# Altium PCB PHASE_SHIFTER.PcbDoc (part 2 of 2)
Units mm, origin at the board's own origin, x right, y up, seen from the top; angles counter-clockwise.
Board outline 49.45 x 41.36 mm, 4 copper layers (Top Layer, GND, signal, Bottom Layer), stack 0.619 mm thick; 108 components, 104 nets, 427 pads, 760 vias.
Unrouted connection lines stored in the file: 109.
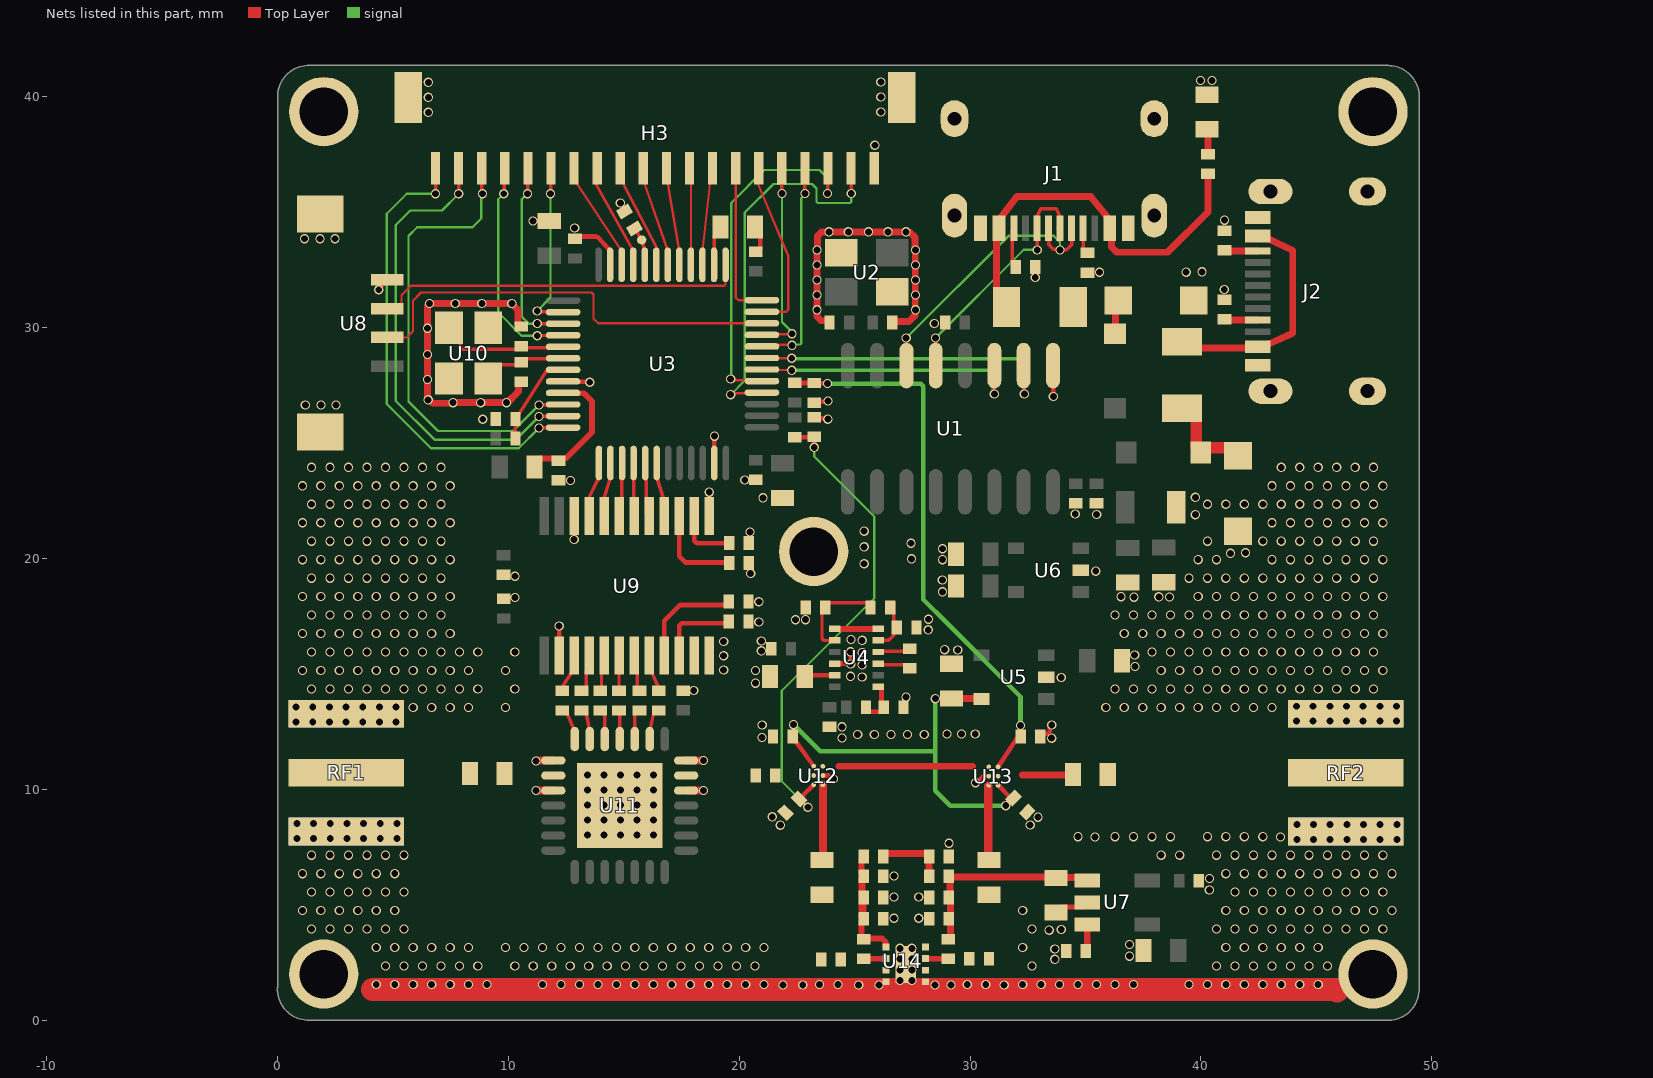
[diagram p4: the nets of this part, all layers, seen from the top]

## Via types
v1: diameter 0.4, hole 0.3, Top Layer to Bottom Layer, tented both sides, 760 vias

## Nets (pads, with @x,y where several pads share a name; then routed paths per layer and width w, separated by ;. In a path a pad name is that pad's centre, name@x,y a point inside that pad or via, vN(x,y) a via of type N, cw(c..) or ccw(c..) an arc to the next point about the centre after c; other vN are vias at no path point) (continued)
GND: C1.1 C2.1 C3.1 C4.1 C5.1 C6.2 C7.2 C8.2 C9.2 C10.2 C11.2 C12.2 C13.2 C15.1 C16.1 C17.1 C18.2 C19.2 C20.2 C21.1 C22.1 C23.1 C24.1 C25.1 C26.2 C27.2 C28.2 C29.1 C30.2 C31.2 C32.1 C33.2 C34.1 C35.1 C36.1 C37.1 C38.1 C39.1 C43.1 C46.1 D2.2 D4.2 D5.2 H3.20 H3.21 H3.22 J1.13 J1.14 J1.A1B12 J1.B1A12 J2.13 J2.14 J2.A1B12 J2.B1A12 pad. R2.2 R3.2 R4.2 R5.2 R7.2 R10.2 R11.1 R12.1 R14.2 R15.2 R16.1 R17.1 R26.2 R27.2 RF1.2 RF1.3 RF1.4 RF2.2 RF2.3 RF2.4 U1.1 U2.2 U2.4 U3.8 U3.23 U3.47 U4.1 U4.4 U4.12 U4.13 U5.2 U6.2 U7.2 U8.1 U8.5 U8.6 U9.2 U9.11 U9.12 U9.13 U9.22 U10.2 U10.4 U11.1 U11.3 U11.19 U11.21 U11.29 U12.2 U13.2 U14.0 U14.3 U14.4 U14.5 U14.6 U14.8 | length 90.2
  Top Layer w0.2: U9.2@12.2,15.802 v1(12.2,17.075) ; U3.8@12.373,27.672 12.388,27.656 13.504,27.656 v1(13.525,27.636) ; v1@12.85,20.825 U9.22@12.85,21.848 ; C22.1@12.9,33.95 13.759,33.95 ; 13.76,33.95 cw(c13.758,33.75) 13.906,33.884 14.044,33.733 14.408,33.331 U3.47@14.408,32.721 ; v1(14.85,35.4) 14.995,35.148 R11.1@15.038,35.029 ; U9.13@18.7,21.848 v1(18.7,22.875) ; U3.23@18.924,24.136 18.924,25.299 v1(18.925,25.3) ; R27.2@23.25,26.75 23.289,26.789 23.81,26.789 v1(23.848,26.827) ; R26.2@23.251,26.116 23.292,26.075 23.8,26.075 v1(23.839,26.036) ; U12.2@23.625,10.6 23.871,10.599 24.021,10.45 v1(24.075,10.45) ; U4.4@24.135,15.45 v1@24.825,15.45 ; v1@24.825,15.95 24.829,15.946 24.827,15.944 24.827,15.441 v1@24.829,15.439 ; v1(30.238,10.288) 30.292,10.288 30.576,10.572 U13.2@30.811,10.573 ; R4.2@32.822,32.627 32.859,32.59 R4.2@32.859,32.346 ; R4.2@32.824,32.627 32.826,32.63 R4.2@32.826,32.812 ; C43.1@33.05,12.25 33.05,12.294 33.162,12.406 33.342,12.406 33.442,12.506 33.442,12.69 v1(33.538,12.786) ; U1.1@33.591,28.356 33.599,28.348 33.599,27.022 v1(33.607,27.014) ; C23.1@33.713,4.665 33.954,4.906 34.881,4.906 U7.2@35.075,5.1 ; U7.2@35.088,4.911 U7.2@35.113,4.936
  Top Layer w0.25: v1(4.386,31.642) 4.386,31.712 U8.1@4.75,32.075 ; U4.1@24.135,16.95 U4.12@26.015,16.95 ; U5.2@33.298,14.864 U5.2@33.328,14.835 ; R12.1@34.166,3.006 R12.1@34.198,2.973
  Top Layer w0.3: v1(6.5,28.838) v1(6.5,29.975) 6.5,30.962 v1(6.588,31.05) v1(7.7,31.05) v1(8.85,31.05) 10.104,31.05 v1@10.117,31.036 ; v1@6.55,28.838 6.55,28.783 6.5,28.733 v1(6.5,27.75) 6.5,26.9 v1(6.525,26.875) 6.579,26.875 6.729,26.725 7.575,26.725 v1(7.6,26.75) v1(8.8,26.75) v1(9.925,26.75) 9.944,26.769 9.974,26.769 10.442,27.237 10.442,27.609 10.519,27.686 C30.2@10.561,27.686 ; v1(10.15,31.05) 10.15,31.023 10.417,30.755 10.417,30.161 10.492,30.086 C28.2@10.557,30.086 ; v1(23.372,33.368) 23.391,33.387 23.391,33.974 23.567,34.15 v1(23.887,34.15) v1(24.725,34.15) v1(25.601,34.15) v1@26.412,34.15 ; v1@23.375,33.368 23.375,32.719 23.375,32.069 23.375,31.42 23.375,30.77 23.375,30.476 23.551,30.3 23.841,30.3 C7.2@23.912,30.229 ; v1(26.44,34.15) v1(27.225,34.15) ; C6.2@26.627,30.228 26.674,30.275 27.35,30.275 27.625,30.55 27.625,30.77 27.625,31.42 27.625,32.069 27.625,32.719 27.625,33.368 27.613,33.38 27.613,33.916 27.398,34.131 27.271,34.131 v1@27.245,34.105
  Top Layer w0.35: v1(11.2,11.225) 11.214,11.225 11.236,11.247 11.945,11.247 U11.1@11.947,11.25 ; v1@11.3,9.95 U11.3@11.974,9.95 ; U11.21@17.703,11.25 v1(18.45,11.25) ; U11.19@17.81,9.948 v1(18.45,9.948)
  Top Layer w1: 4.125,1.327 45.848,1.327 45.9,1.275
  other v1: 21.9,1.525 22.75,1.525 25.175,1.525 26.05,1.525 28.475,1.525 29.175,1.525 31.475,1.525 4.278,1.549 5.078,1.549 5.878,1.549 6.678,1.549 7.478,1.549 8.278,1.549 9.078,1.549 11.478,1.549 12.278,1.549 13.078,1.549 13.878,1.549 14.678,1.549 15.478,1.549 16.278,1.549 17.078,1.549 17.878,1.549 18.678,1.549 19.478,1.549 20.278,1.549 21.078,1.549 23.478,1.549 24.278,1.549 29.878,1.549 30.678,1.549 32.279,1.549 33.079,1.549 33.879,1.549 34.679,1.549 35.479,1.549 36.279,1.549 37.079,1.549 39.479,1.549 40.279,1.549 41.079,1.549 41.879,1.549 42.679,1.549 43.479,1.549 44.279,1.549 45.079,1.549 26.959,1.718 27.475,1.718 26.959,2.184 27.475,2.184 4.678,2.349 5.478,2.349 6.278,2.349 7.078,2.349 7.878,2.349 8.678,2.349 10.278,2.349 11.078,2.349 11.878,2.349 12.678,2.349 13.478,2.349 14.278,2.349 15.078,2.349 15.878,2.349 16.678,2.349 17.478,2.349 18.278,2.349 19.078,2.349 19.878,2.349 20.678,2.349 32.678,2.349 40.679,2.349 41.479,2.349 42.279,2.349 43.079,2.349 43.879,2.349 44.679,2.349 45.479,2.349 26.959,2.65 27.475,2.65 33.67,2.637 36.9,2.775 33.671,3.083 26.959,3.116 27.475,3.116 4.278,3.149 5.078,3.149 5.878,3.149 6.678,3.149 7.478,3.149 8.278,3.149 9.878,3.149 10.678,3.149 11.478,3.149 12.278,3.149 13.078,3.149 13.878,3.149 14.678,3.149 15.478,3.149 16.278,3.149 17.078,3.149 17.878,3.149 18.678,3.149 19.478,3.149 20.278,3.149 21.078,3.149 32.279,3.149 41.079,3.149 41.879,3.149 42.679,3.149 43.479,3.149 44.279,3.149 45.079,3.149 36.9,3.275 33.425,3.9 33.95,3.925 1.478,3.949 2.278,3.949 3.078,3.949 3.878,3.949 4.678,3.949 5.478,3.949 32.678,3.949 40.679,3.949 41.479,3.949 42.279,3.949 43.079,3.949 43.879,3.949 44.679,3.949 45.479,3.949 46.279,3.949 47.079,3.949 47.879,3.949 26.7,4.418 27.775,4.418 1.078,4.749 1.878,4.749 2.678,4.749 3.478,4.749 4.278,4.749 5.078,4.749 32.279,4.749 41.079,4.749 41.879,4.749 42.679,4.749 43.479,4.749 44.279,4.749 45.079,4.749 45.879,4.749 46.679,4.749 47.479,4.749 48.279,4.749 26.7,5.343 27.775,5.343 1.478,5.549 2.278,5.549 3.078,5.549 3.878,5.549 4.678,5.549 5.478,5.549 41.479,5.549 42.279,5.549 43.079,5.549 43.879,5.549 44.679,5.549 45.479,5.549 46.279,5.549 47.079,5.549 47.879,5.549 40.364,5.645 40.369,6.135 26.7,6.243 1.078,6.349 1.878,6.349 2.678,6.349 3.478,6.349 4.278,6.349 5.078,6.349 41.079,6.349 41.879,6.349 42.679,6.349 43.479,6.349 44.279,6.349 45.079,6.349 45.879,6.349 46.679,6.349 47.479,6.349 48.279,6.349 1.478,7.149 2.278,7.149 3.078,7.149 3.878,7.149 4.678,7.149 5.478,7.149 38.279,7.149 39.079,7.149 40.679,7.149 41.479,7.149 42.279,7.149 43.079,7.149 43.879,7.149 44.679,7.149 45.479,7.149 46.279,7.149 47.079,7.149 47.879,7.149 29.084,7.665 44.153,7.83 44.875,7.83 45.597,7.83 46.318,7.83 47.04,7.83 47.762,7.83 48.484,7.83 0.84,7.869 1.562,7.869 2.284,7.869 3.006,7.869 3.728,7.869 4.449,7.869 5.171,7.869 35.415,7.936 34.679,7.949 36.279,7.949 37.079,7.949 37.879,7.949 38.679,7.949 40.279,7.949 41.079,7.949 41.879,7.949 42.679,7.949 43.444,7.942 13.419,8.027 14.138,8.027 14.856,8.027 15.575,8.027 16.294,8.027 21.779,8.45 32.603,8.454 44.153,8.478 44.875,8.478 45.597,8.478 46.318,8.478 47.04,8.478 47.762,8.478 48.484,8.478 0.84,8.516 1.562,8.516 2.284,8.516 3.006,8.516 3.728,8.516 4.449,8.516 5.171,8.516 13.419,8.676 14.138,8.676 14.856,8.676 15.575,8.676 16.294,8.676 32.937,8.797 21.432,8.81 13.419,9.325 14.138,9.325 14.856,9.325 15.575,9.325 16.294,9.325 11.2,9.95 13.419,9.974 14.138,9.974 14.856,9.974 15.575,9.974 16.294,9.974 13.419,10.623 14.138,10.623 14.856,10.623 15.575,10.623 16.294,10.623 24.448,12.223 33.532,12.219 20.984,12.242 25.13,12.381 25.851,12.381 26.572,12.381 27.292,12.381 28.013,12.381 29,12.4 29.625,12.4 30.225,12.4 24.448,12.709 20.994,12.784 0.805,12.924 1.527,12.924 2.248,12.924 2.97,12.924 3.692,12.924 4.414,12.924 5.136,12.924 44.138,12.953 44.859,12.953 45.581,12.953 46.303,12.953 47.025,12.953 47.746,12.953 48.468,12.953 5.878,13.549 6.678,13.549 7.478,13.549 8.278,13.549 9.878,13.549 35.879,13.549 36.679,13.549 37.479,13.549 38.279,13.549 39.079,13.549 39.879,13.549 40.679,13.549 41.479,13.549 42.279,13.549 43.079,13.549 0.805,13.571 1.527,13.571 2.248,13.571 2.97,13.571 3.692,13.571 4.414,13.571 5.136,13.571 44.138,13.6 44.859,13.6 45.581,13.6 46.303,13.6 47.025,13.6 47.746,13.6 48.468,13.6 27.221,13.995 18.031,14.284 1.478,14.349 2.278,14.349 3.078,14.349 3.878,14.349 4.678,14.349 5.478,14.349 6.278,14.349 7.078,14.349 7.878,14.349 8.678,14.349 10.278,14.349 36.279,14.349 37.079,14.349 37.879,14.349 38.679,14.349 39.479,14.349 40.279,14.349 41.079,14.349 41.879,14.349 42.679,14.349 43.479,14.349 44.279,14.349 45.079,14.349 45.879,14.349 46.679,14.349 47.479,14.349 20.7,14.6 33.95,14.846 25.326,14.865 24.821,14.898 1.078,15.149 1.878,15.149 2.678,15.149 3.478,15.149 4.278,15.149 5.078,15.149 5.878,15.149 6.678,15.149 7.478,15.149 8.278,15.149 9.878,15.149 20.7,15.15 38.279,15.149 39.079,15.149 39.879,15.149 40.679,15.149 41.479,15.149 42.279,15.149 43.079,15.149 43.879,15.149 44.679,15.149 45.479,15.149 46.279,15.149 47.079,15.149 47.879,15.149 19.325,15.175 37.139,15.32 25.326,15.396 24.829,15.428 19.325,15.787 37.128,15.815 25.326,15.925 1.478,15.949 2.278,15.949 3.078,15.949 3.878,15.949 4.678,15.949 5.478,15.949 6.278,15.949 7.078,15.949 7.878,15.949 8.678,15.949 10.278,15.949 24.825,15.958 37.879,15.949 38.679,15.949 39.479,15.949 40.279,15.949 41.079,15.949 41.879,15.949 42.679,15.949 43.479,15.949 44.279,15.949 45.079,15.949 45.879,15.949 46.679,15.949 47.479,15.949 20.956,16 29.467,16.035 28.9,16.05 19.325,16.4 20.956,16.423 25.326,16.456 24.841,16.489 1.078,16.749 1.878,16.749 2.678,16.749 3.478,16.749 4.278,16.749 5.078,16.749 5.878,16.749 6.678,16.749 7.478,16.749 36.679,16.749 37.479,16.749 38.279,16.749 39.079,16.749 39.879,16.749 40.679,16.749 41.479,16.749 42.279,16.749 43.079,16.749 43.879,16.749 44.679,16.749 45.479,16.749 46.279,16.749 47.079,16.749 47.879,16.749 28.187,16.912 20.85,17.252 22.436,17.347 22.875,17.35 28.195,17.368 1.478,17.549 2.278,17.549 3.078,17.549 3.878,17.549 4.678,17.549 5.478,17.549 6.278,17.549 7.078,17.549 36.279,17.549 37.079,17.549 37.879,17.549 38.679,17.549 39.479,17.549 40.279,17.549 41.079,17.549 41.879,17.549 42.679,17.549 43.479,17.549 44.279,17.549 45.079,17.549 45.879,17.549 46.679,17.549 47.479,17.549 20.85,18.127 10.292,18.311 37.105,18.325 1.078,18.349 1.878,18.349 2.678,18.349 3.478,18.349 4.278,18.349 5.078,18.349 5.878,18.349 6.678,18.349 7.478,18.349 36.536,18.348 38.175,18.338 38.639,18.334 39.879,18.349 40.679,18.349 41.479,18.349 42.279,18.349 43.079,18.349 43.879,18.349 44.679,18.349 45.479,18.349 46.279,18.349 47.079,18.349 47.879,18.349 28.803,18.556 28.797,19.066 1.478,19.149 2.278,19.149 3.078,19.149 3.878,19.149 4.678,19.149 5.478,19.149 6.278,19.149 7.078,19.149 39.479,19.149 40.279,19.149 41.079,19.149 41.879,19.149 42.679,19.149 43.479,19.149 44.279,19.149 45.079,19.149 45.879,19.149 46.679,19.149 47.479,19.149 10.289,19.231 20.497,19.346 35.444,19.452 25.413,19.773 1.078,19.949 1.878,19.949 2.678,19.949 3.478,19.949 4.278,19.949 5.078,19.949 5.878,19.949 6.678,19.949 7.478,19.949 28.8,19.95 39.879,19.949 40.679,19.949 43.079,19.949 43.879,19.949 44.679,19.949 45.479,19.949 46.279,19.949 47.079,19.949 47.879,19.949 27.463,19.986 41.275,20.225 41.925,20.25 28.801,20.422 25.413,20.507 27.443,20.661 1.478,20.749 2.278,20.749 3.078,20.749 3.878,20.749 4.678,20.749 5.478,20.749 6.278,20.749 7.078,20.749 40.279,20.749 42.679,20.749 43.479,20.749 44.279,20.749 45.079,20.749 45.879,20.749 46.679,20.749 47.479,20.749 12.85,20.825 20.472,21.152 25.413,21.186 1.078,21.549 1.878,21.549 2.678,21.549 3.478,21.549 4.278,21.549 5.078,21.549 5.878,21.549 6.678,21.549 7.478,21.549 43.079,21.549 43.879,21.549 44.679,21.549 45.479,21.549 46.279,21.549 47.079,21.549 47.879,21.549 39.755,21.9 34.556,21.928 35.482,21.911 1.478,22.349 2.278,22.349 3.078,22.349 3.878,22.349 4.678,22.349 5.478,22.349 6.278,22.349 7.078,22.349 40.279,22.349 41.079,22.349 41.879,22.349 42.679,22.349 43.479,22.349 44.279,22.349 45.079,22.349 45.879,22.349 46.679,22.349 47.479,22.349 21.031,22.627 39.755,22.65 1.078,23.149 1.878,23.149 2.678,23.149 3.478,23.149 4.278,23.149 5.078,23.149 5.878,23.149 6.678,23.149 7.478,23.149 43.079,23.149 43.879,23.149 44.679,23.149 45.479,23.149 46.279,23.149 47.079,23.149 47.879,23.149 12.694,23.377 20.24,23.403 1.478,23.949 2.278,23.949 3.078,23.949 3.878,23.949 4.678,23.949 5.478,23.949 6.278,23.949 7.078,23.949 43.479,23.949 44.279,23.949 45.079,23.949 45.879,23.949 46.679,23.949 47.479,23.949 8.891,26.031 1.205,26.644 1.88,26.644 2.53,26.644 28.45,30.175 23.372,30.77 27.632,30.77 23.372,31.42 27.632,31.42 41.01,31.658 23.372,32.069 27.632,32.069 32.824,32.169 35.602,32.398 39.361,32.404 40.043,32.416 23.372,32.719 27.632,32.719 27.632,33.368 1.169,33.849 1.844,33.849 2.494,33.849 12.873,34.316 11.071,34.618 41.02,34.656 25.875,37.9 6.533,39.327 26.134,39.339 6.533,39.977 26.134,39.989 6.533,40.627 26.134,40.639 39.975,40.7 40.475,40.7
HXT_IN: C28.1 U3.5 U10.1 | length 5.7
  Top Layer w0.15: U10.1@7.425,30 7.915,29.51 7.915,29.144 8.003,29.056 10.472,29.056 C28.1@10.611,29.195 ; C28.1@10.557,29.236 10.667,29.126 11.684,29.126 11.728,29.17 U3.5@12.373,29.17
HXT_OUT: C30.1 U3.6 U10.3 | length 3.6
  Top Layer w0.15: U10.3@9.125,27.8 9.125,27.9 9.622,28.397 10.343,28.397 10.506,28.559 C30.1@10.631,28.559 ; C30.1@10.651,28.654 12.358,28.654 U3.6@12.373,28.67
LED: D6.2 U3.38 | length 1.4
  Top Layer w0.15: U3.38@18.913,32.726 18.913,33.944 D6.2@19.035,34.065
LNA_5V: C23.2 C34.2 C38.2 L3.2 R24.2 U7.1 | length 9
  Top Layer w0.3: L3.2@29.055,3.507 29.073,3.507 29.148,3.582 29.148,4.326 C38.2@29.077,4.397 29.143,4.464 29.143,5.256 C34.2@29.077,5.322 29.139,5.384 29.139,6.173 R24.2@29.077,6.235 ; R24.2@29.077,6.2 33.678,6.2 C23.2@33.713,6.165 ; C23.2@33.732,6.184 34.941,6.184 U7.1@35.075,6.05 U7.1@35.106,6.081
LNA_IN: C44.2 C47.2
LNA_OUT: C45.1 C48.2
NetA4B9: J2.A4B9 J2.B4A9 X2.2 | length 9.4
  Top Layer w0.3: X2.2@39.125,29.42 39.436,29.109 42.397,29.109 J2.A4B9@42.461,29.173 ; J2.B4A9@42.92,33.849 43.975,33.341 43.975,29.763 J2.A4B9@42.938,29.289
NetC8_1: C8.1 R8.1 U4.11 | length 2.2
  Top Layer w0.15: U4.11@26.015,16.45 26.462,16.45 26.691,16.679 26.691,16.856 C8.1@26.841,17.006 ; C8.1@26.685,17 R8.1@26.685,18.064
NetC14_1: C14.1 U4.9 | length 1.5
  Top Layer w0.15: U4.9@26.015,15.45 26.073,15.392 27.159,15.392 27.309,15.241 C14.1@27.384,15.241
NetC14_2: C14.2 U4.10 | length 1.5
  Top Layer w0.15: U4.10@26.015,15.95 26.052,15.987 27.28,15.987 C14.2@27.409,16.116
NetC16_2: C16.2 U4.5 | length 1.1
  Top Layer w0.2: C16.2@22.997,14.95 U4.5@24.135,14.95
NetC31_1: C31.1 R24.1 R25.1 | length 3
  Top Layer w0.3: R25.1@26.245,7.086 26.245,7.15 26.32,7.225 28.152,7.225 28.227,7.15 R24.1@28.227,6.235
NetC32_2: C32.2 C36.2 C39.2 L2.2 R25.2 U14.1 | length 6
  Top Layer w0.25: C36.2@25.395,5.252 C39.2@25.395,4.398 25.3,4.304 25.3,3.61 L2.2@25.394,3.516 25.422,3.543 26.189,3.543 26.336,3.397 26.336,3.191 U14.1@26.361,3.167 ; C32.2@25.395,6.236 25.295,6.336 25.295,6.986 R25.2@25.395,7.086
  Top Layer w0.3: C39.2@25.395,4.398 25.324,4.469 25.324,5.252 C36.2@25.395,5.323 25.327,5.391 25.327,6.168 C32.2@25.395,6.236
NetC40_1: C40.1 U11.2
NetC40_2: C40.2 RF1.1
NetC41_1: C41.1 U12.5
NetC41_2: C41.2 U11.20
NetC42_1: C42.1 RF2.1
NetC42_2: C42.2 U13.5 | length 2.2
  Top Layer w0.292: 32.262,10.619 C42.2@34.46,10.619
NetC43_2: 
NetC44_1: C44.1 L2.1 U14.2 | length 1
  Top Layer w0.25: L2.1@25.396,2.666 U14.2@26.361,2.666
NetC45_2: C45.2 L3.1 U14.7 | length 1
  Top Layer w0.25: U14.7@28.065,2.662 L3.1@29.051,2.662
NetC47_1: C47.1 U12.1 | length 3.3
  Top Layer w0.358: C47.1@23.625,6.91 U12.1@23.625,10.2
NetC48_1: C48.1 U13.3 | length 3.3
  Top Layer w0.358: C48.1@30.792,6.885 U13.3@30.792,10.154
NetD1_2: D1.2 D2.1 X2.1 | length 4.2
  Top Layer w0.5: X2.1@39.394,26.53 39.577,26.53 39.795,26.312 39.795,24.818 39.904,24.71 D1.2@40.055,24.71 ; D1.2@39.988,24.586 40.197,24.795 41.251,24.795 41.6,24.446 D2.1@41.6,24.385
NetD3_2: D3.2 D4.1 X1.1 | length 1.8
  Top Layer w0.3: D4.1@36.215,31.35 36.29,31.425 36.29,29.75 D3.2@36.275,29.735
NetD5_1: D5.1 R1.1 | length 1.1
  Top Layer w0.3: D5.1@40.263,38.59 40.306,38.547 R1.1@40.306,37.509
NetD6_1: D6.1 R6.1 | length 1.4
  Top Layer w0.2: D6.1@20.585,34.313 20.91,33.987 20.91,33.414 20.767,33.271 R6.1@20.623,33.271
NetJ1_A4B9: J1.A4B9 J1.B4A9 R1.2 X1.2 | length 16.8
  Top Layer w0.3: X1.2@31.146,31.475 J1.B4A9@31.146,34.3 ; J1.B4A9@31.25,34.3 31.209,34.605 32.026,35.675 35.229,35.675 36.084,34.609 J1.A4B9@36.05,34.3 36.125,34.225 36.125,33.501 36.359,33.266 38.557,33.266 40.306,35.015 R1.2@40.306,36.659
NetJ1_A5: J1.A5 R2.1 | length 0.9
  Top Layer w0.15: R2.1@34.9,33.375 J1.A5@34.9,34.3
NetJ1_A7: J1.A7 J1.B7 U1.6 | length 13.1
  Top Layer w0.15: v1(27.232,29.547) 27.236,29.542 27.236,28.094 U1.6@27.27,28.061 ; J1.A7@33.4,34.3 33.4,33.6 33.607,33.394 33.865,33.394 v1(33.899,33.359) 33.92,33.38 34.18,33.38 34.4,33.6 J1.B7@34.4,34.3
  signal w0.1: v1(27.232,29.547) 31.66,33.975 33.625,33.975 33.891,33.709 33.891,33.368 v1(33.899,33.359)
NetJ1_B5: J1.B5 R4.1 | length 1.6
  Top Layer w0.15: R4.1@31.829,32.764 31.829,34.229 J1.B5@31.9,34.3 ; R4.1@31.831,32.764 R4.1@31.84,32.773
NetJ2_A5: J2.A5 R3.1 | length 1.5
  Top Layer w0.3: R3.1@40.982,30.366 41.025,30.323 J2.A5@42.461,30.323
NetJ2_B5: J2.B5 R5.1 | length 1.5
  Top Layer w0.3: R5.1@40.995,33.323 J2.B5@42.461,33.323 ; R5.1@40.999,33.315 R5.1@41.013,33.329
NetL5_1: 
NetL5_2: 
NetR7_1: R7.1 R8.2 U4.2 | length 4.2
  Top Layer w0.15: R7.1@23.734,17.919 23.734,17.991 23.832,18.089 25.564,18.089 R8.2@25.709,17.944 ; R7.1@23.784,17.969 23.586,17.771 23.586,16.537 23.674,16.449 U4.2@24.135,16.45
NetR9_2: R9.2 R10.1 U4.7 | length 2.1
  Top Layer w0.2: R9.2@25.491,13.556 25.491,13.493 25.616,13.368 26.141,13.368 26.266,13.493 R10.1@26.266,13.556 26.163,13.556 26.163,14.41 26.123,14.45 U4.7@26.015,14.45
NetR11_2: R11.2 TP1.1 U3.44 | length 1.7
  Top Layer w0.15: R11.2@15.463,34.293 15.571,34.153 TP1.1@15.775,33.8 15.909,33.331 U3.44@15.909,32.721
NetR12_2: R12.2 U7.3 | length 1.1
  Top Layer w0.3: R12.2@35,2.887 R12.2@35.067,2.954 ; R12.2@35.075,3.163 U7.3@35.075,4.15
NetR14_1: R14.1 U9.9 | length 4.7
  Top Layer w0.2: U9.9@16.75,15.802 16.75,17.3 17.438,17.988 19.425,17.988 19.55,18.113 R14.1@19.55,18.134
NetR15_1: R15.1 U9.10 | length 3.5
  Top Layer w0.2: U9.10@17.4,15.802 17.4,17.084 17.517,17.201 19.482,17.201 R15.1@19.55,17.269
NetR16_2: R16.2 U9.15 | length 4
  Top Layer w0.2: U9.15@17.4,21.848 17.4,20.1 17.675,19.825 R16.2@19.568,19.825
NetR17_2: R17.2 U9.14 | length 2.7
  Top Layer w0.2: U9.14@18.05,21.848 18.05,20.77 18.167,20.653 R17.2@19.543,20.653 ; R17.2@19.496,20.606 R17.2@19.543,20.653 ; R17.2@19.568,20.653 R17.2@19.543,20.653 ; R17.2@19.568,20.678 R17.2@19.543,20.653
NetR32_1: 
NetU12_3: U12.3 U13.1 | length 5.8
  Top Layer w0.292: 24.325,11.004 30.106,11.004
NRST: C29.2 R13.1 U3.7 | length 3.4
  Top Layer w0.15: R13.1@10.307,25.2 C29.2@10.307,26.036 10.457,26.261 U3.7@11.667,28.162
P1: R18.2 U11.28 | length 1.4
  Top Layer w0.15: R18.2@12.336,13.418 12.536,13.293 12.875,12.523 U11.28@12.875,12.178
P1_CTL: R18.1 U9.3 | length 1.7
  Top Layer w0.15: R18.1@12.336,14.268 12.309,14.385 12.725,15.051 U9.3@12.85,15.802
P1_IN: U3.13 U9.21 | length 1.6
  Top Layer w0.15: U9.21@13.492,22.633 13.923,23.526 U3.13@13.923,24.136
P2: R19.2 U11.27 | length 1.4
  Top Layer w0.15: R19.2@13.371,13.293 U11.27@13.525,12.523
  Top Layer w0.2: R19.2@13.171,13.418 R19.2@13.371,13.293 ; U11.27@13.525,12.178 U11.27@13.525,12.523
P2_CTL: R19.1 U9.4 | length 1.6
  Top Layer w0.15: R19.1@13.171,14.268 13.375,14.418 13.375,15.052 U9.4@13.5,15.802
P2_IN: U3.14 U9.20 | length 1.5
  Top Layer w0.15: U9.20@14.156,22.644 14.423,23.526 U3.14@14.423,24.136
P3: R20.2 U11.26 | length 1.3
  Top Layer w0.15: R20.2@13.981,13.418 14.175,13.268 U11.26@14.175,12.178
P3_CTL: R20.1 U9.5 | length 1.6
  Top Layer w0.15: R20.1@13.981,14.268 14.035,14.322 14.035,15.112 U9.5@14.15,15.802
P3_IN: U3.15 U9.19 | length 2.3
  Top Layer w0.15: U9.19@14.8,21.848 14.906,21.954 14.906,24.119 U3.15@14.923,24.136
P4: R21.2 U11.25 | length 1.2
  Top Layer w0.15: R21.2@14.791,13.418 14.825,13.268 U11.25@14.825,12.178
P4_CTL: R21.1 U9.6 | length 1.5
  Top Layer w0.15: R21.1@14.791,14.268 14.792,14.418 14.792,15.052 U9.6@14.8,15.802
P4_IN: U3.16 U9.18 | length 2.3
  Top Layer w0.15: U3.16@15.424,24.136 15.437,24.123 15.437,21.861 U9.18@15.45,21.848
P5: R22.2 U11.24 | length 1.3
  Top Layer w0.15: U11.24@15.475,12.178 15.475,13.268 R22.2@15.676,13.418
P5_CTL: R22.1 U9.7 | length 1.6
  Top Layer w0.15: U9.7@15.45,15.802 15.575,15.052 15.575,14.418 R22.1@15.676,14.268
P5_IN: U3.17 U9.17 | length 2.4
  Top Layer w0.15: U3.17@15.924,24.136 15.924,23.491 15.982,23.432 15.982,21.965 U9.17@16.1,21.848
P6: R23.2 U11.23 | length 1.4
  Top Layer w0.15: U11.23@16.125,12.178 16.125,12.523 16.286,13.268 R23.2@16.511,13.418
P6_CTL: R23.1 U9.8 | length 1.4
  Top Layer w0.15: U9.8@16.1,15.802 16.225,15.052 R23.1@16.488,14.432
P6_IN: U3.18 U9.16 | length 1.5
  Top Layer w0.15: U3.18@16.424,24.136 16.424,23.526 U9.16@16.704,22.629
PA0: H3.3 U3.10 | length 20.6
  Top Layer w0.15: H3.3@8.845,36.908 8.845,35.78 v1@8.875,35.75 ; v1(11.325,26.65) 11.335,26.66 12.363,26.66 U3.10@12.373,26.671
  signal w0.1: v1(8.875,35.8) 8.825,35.75 8.825,34.725 8.45,34.35 6.05,34.35 5.675,33.975 5.675,26.8 6.95,25.525 10.2,25.525 v1(11.325,26.65)
PA1: H3.2 U3.11 | length 20.4
  Top Layer w0.15: H3.2@7.845,36.908 7.845,35.755 v1@7.85,35.75 ; v1(11.325,26.15) 11.335,26.16 12.363,26.16 U3.11@12.373,26.17
  signal w0.1: v1(7.848,35.8) 7.123,35.075 5.75,35.075 5.125,34.45 5.125,26.825 6.8,25.15 10.325,25.15 v1(11.325,26.15)
PA2: H3.1 U3.12 | length 20.7
  Top Layer w0.15: v1@6.845,35.705 H3.1@6.845,36.908 ; v1(11.325,25.65) 11.335,25.66 12.363,25.66 U3.12@12.373,25.67
  signal w0.1: v1(6.845,35.8) 5.6,35.8 4.736,34.936 4.736,26.689 6.65,24.775 10.45,24.775 v1(11.325,25.65)
PA8: H3.18 U3.29 | length 15.6
  Top Layer w0.1: v1@19.605,27.779 19.662,27.721 19.749,27.721 19.754,27.717 20.954,27.717 U3.29@20.984,27.687
  Top Layer w0.15: H3.18@23.845,36.908 23.845,35.905 v1@23.85,35.9
  signal w0.1: v1(19.631,27.779) 19.653,27.801 19.653,35.403 21.075,36.825 23.475,36.825 23.826,36.474 v1(23.826,35.814)
PA11: H3.17 U3.32 | length 9.4
  Top Layer w0.1: U3.32@20.984,29.185 21.642,29.185 21.71,29.253 22.262,29.253 v1(22.28,29.235)
  Top Layer w0.15: H3.17@22.845,36.908 22.847,36.906 22.847,35.764 v1@22.849,35.762
  signal w0.1: v1(22.28,29.235) 22.312,29.267 22.628,29.267 22.686,29.326 22.686,35.6 v1@22.849,35.762
  other v1: 22.849,35.814
PA12: H3.16 U3.33 | length 8.7
  Top Layer w0.1: U3.33@20.984,29.686 21.642,29.686 21.667,29.71 22.256,29.71 v1(22.28,29.735)
  Top Layer w0.15: H3.16@21.845,36.908 21.848,36.905 21.848,35.817 v1(21.851,35.814)
  signal w0.1: v1(21.851,35.814) 21.851,30.239 22.28,29.81 v1(22.28,29.735)
PB3: H3.13 U3.39 | length 3.5
  Top Layer w0.1: U3.39@18.408,32.721 18.408,33.331 H3.13@18.73,36.251
PB4: H3.12 U3.40 | length 4.2
  Top Layer w0.1: H3.12@17.845,36.908 17.908,36.845 U3.40@17.908,32.721
PB5: H3.11 U3.41 | length 3.6
  Top Layer w0.1: H3.11@16.91,36.251 17.407,33.331 U3.41@17.407,32.721
PB6: H3.10 U3.42 | length 3.7
  Top Layer w0.1: H3.10@15.892,36.244 16.907,33.331 U3.42@16.907,32.721
PB7: H3.9 U3.43 | length 3.9
  Top Layer w0.1: H3.9@14.845,36.908 15.021,36.145 U3.43@16.45,33.424
PB8: H3.8 U3.45 | length 3.9
  Top Layer w0.1: H3.8@13.784,36.237 15.408,33.331 U3.45@15.408,32.721
PB9: H3.7 U3.46 | length 4.1
  Top Layer w0.1: H3.7@12.977,36.223 14.908,33.331 U3.46@14.908,32.721
PB15: H3.19 U3.28 | length 16.8
  Top Layer w0.1: v1(19.631,27.096) 19.687,27.152 20.95,27.152 U3.28@20.984,27.186
  Top Layer w0.15: H3.19@24.845,36.908 24.848,36.905 24.848,35.817 v1(24.851,35.814)
  signal w0.1: v1(19.631,27.096) 20.233,27.699 20.233,34.977 21.481,36.224 23.151,36.224 23.35,36.025 23.35,35.458 23.409,35.399 24.793,35.399 24.851,35.458 v1(24.851,35.814)
PC13: H3.6 U3.2 | length 7.6
  Top Layer w0.15: v1(11.25,30.726) 11.28,30.696 12.348,30.696 U3.2@12.373,30.671 ; v1(11.825,35.8) 11.835,35.81 11.835,36.898 H3.6@11.845,36.908
  signal w0.1: v1(11.25,30.726) 11.824,31.3 v1@11.824,35.799
PC14: H3.5 U3.3 | length 8.5
  Top Layer w0.15: v1@10.835,35.76 10.835,36.898 H3.5@10.845,36.908 ; v1(11.25,30.174) 11.252,30.173 12.371,30.173 U3.3@12.373,30.171
  signal w0.1: v1(10.825,35.8) 10.575,35.55 10.575,30.483 10.884,30.174 v1(11.25,30.174)
PC15: H3.4 U3.4 | length 9.6
  Top Layer w0.15: v1@9.823,35.798 9.823,36.885 H3.4@9.845,36.908 ; v1(11.25,29.65) 11.26,29.66 12.363,29.66 U3.4@12.373,29.67
  signal w0.1: v1(9.8,35.8) 9.563,35.563 9.563,30.662 10.575,29.65 v1(11.25,29.65)
PF6: H3.15 U3.35 | length 7.6
  Top Layer w0.1: H3.15@20.845,36.908 20.775,36.838 20.814,36.799 20.814,36.224 22.125,33.104 22.125,30.775 22.036,30.686 U3.35@20.984,30.686
PF7: H3.14 U3.36 | length 6.8
  Top Layer w0.1: H3.14@19.843,36.906 19.843,31.309 19.966,31.187 U3.36@20.984,31.187
RXD: U1.3 U3.30 | length 12
  Top Layer w0.1: U3.30@20.984,28.187 21.002,28.169 22.256,28.169 v1(22.275,28.15)
  Top Layer w0.15: v1@31.05,27.125 31.05,28.046 U1.3@31.063,28.059
  signal w0.15: v1(22.275,28.15) 30.914,28.15 31.002,28.062 31.002,27.173 v1(31.05,27.125)
SWCLK: U3.37 U8.2 | length 16.2
  Top Layer w0.1: U8.2@4.75,30.825 5.2,30.825 5.375,31 5.375,31.407 5.784,31.816 19.35,31.816 19.409,31.874 U3.37@19.409,32.721
SWDIO: U3.34 U8.3 | length 19
  Top Layer w0.1: U8.3@4.75,29.575 5.6,29.575 5.867,29.842 5.867,31.167 6.219,31.519 13.601,31.519 13.687,31.434 13.687,30.388 13.889,30.186 U3.34@20.984,30.186
TXD: U1.2 U3.31 | length 13.7
  Top Layer w0.1: U3.31@20.984,28.685 20.989,28.68 22.27,28.68 v1(22.275,28.675)
  Top Layer w0.15: U1.2@32.331,28.041 32.335,28.036 32.335,27.14 v1(32.35,27.125)
  signal w0.15: v1(22.275,28.675) 22.3,28.65 32.15,28.65 32.35,28.45 v1(32.35,27.125)
USBD_P: J1.A6 J1.B6 U1.5 | length 10
  Top Layer w0.15: v1(28.501,29.556) 28.506,29.551 28.506,28.095 U1.5@28.525,28.076 ; J1.B6@32.898,34.809 33.063,35.149 33.737,35.149 J1.A6@33.901,34.781 ; J1.B6@32.9,34.3 32.905,34.295 32.905,33.364 v1(32.91,33.359) ; J1.A6@33.825,34.375 J1.A6@33.9,34.3
  signal w0.1: v1(28.501,29.556) 32.321,33.375 32.894,33.375 v1(32.91,33.359)
V_DPDT1: C35.2 R26.1 R28.2 U12.6 | length 21.2
  Top Layer w0.2: R28.2@22.406,25.259 R26.1@23.244,25.259 ; C35.2@22.616,9.356 22.741,9.481 22.741,9.716 U12.6@23.225,10.2 ; v1(23.25,24.816) 23.25,25.253 R26.1@23.244,25.259 ; R26.1@23.251,25.266 R26.1@23.244,25.259
  signal w0.1: v1(22.97,9.225) 21.844,10.351 21.844,14.269 25.85,18.275 25.85,21.821 23.25,24.421 v1(23.25,24.816)
V_DPDT2: C43.2 R27.1 R29.2 U13.6 | length 23.5
  Top Layer w0.2: R29.2@22.414,27.6 R27.1@23.25,27.6 23.325,27.6 23.337,27.587 23.812,27.587 v1(23.825,27.575) ; U13.6@31.211,10.973 C43.2@32.024,12.21
  signal w0.2: v1(23.825,27.575) 27.858,27.575 27.975,27.458 27.975,18.225 29.005,17.195 32.183,14.017 v1(32.183,12.771)
VDD_DPDT: C10.1 C37.2 C46.2 U5.5 U12.4 U13.4 | length 17.7
  Top Layer w0.2: C46.2@22.437,12.316 22.437,12.295 22.44,12.093 U12.4@23.225,11 ; U13.4@31.211,10.172 31.757,9.626 C37.2@31.874,9.626
  Top Layer w0.3: C10.1@29.201,13.927 30.485,13.927 U5.5@30.498,13.914
  signal w0.2: v1@22.356,12.801 23.507,11.65 28.493,11.65 ; v1(28.493,13.928) 28.493,11.65 ; v1(31.544,9.293) 29.144,9.293 28.493,9.944 28.493,11.65
  other v1: 22.35,12.801
VDDA: C17.2 L1.2 U3.9 | length 5.9
  Top Layer w0.25: L1.2@11.128,23.959 11.353,24.329 12.098,24.329 12.11,24.341 12.486,24.341 12.491,24.346 12.5,24.346 13.625,25.471 13.625,26.807 13.271,27.161 13.014,27.161 13.01,27.165 12.379,27.165 U3.9@12.373,27.171
pads on no net: J1.A8 J1.B8 J2.A6 J2.A7 J2.A8 J2.B6 J2.B7 J2.B8 U1.9 U1.10 U1.11 U1.12 U1.13 U1.14 U1.15 U3.1 U3.19 U3.21 U3.22 U5.4 U6.4 U11.4 U11.5 U11.6 U11.7 U11.8 U11.9 U11.10 U11.11 U11.12 U11.13 U11.14 U11.15 U11.16 U11.17 U11.18 U14.

## Polygon pours and split planes (outlines as drawn)
GND on Top Layer "NONET_L-01_P-003" (hatched Horizontal grid 0.5 track 1, remove dead copper, pour order 24): 0.375,24.725 0.8,24.3 48.9,24.3 48.9,1.275 47.875,0.25 1.35,0.25 0.025,1.575 0.025,24.075
GND on Top Layer "GND_L01_P025" (hatched Horizontal grid 0.1 track 0.2, pour order 25): 23.598,12.8 30.3,12.8 30.3,12.125 23.575,12.125
GND on Top Layer "GND_L01_P006" (solid, pour order 6): 27.649,32.143 27.649,30.967 26.03,30.967 26.03,32.157
GND on Top Layer "GND_L01_P007" (solid, pour order 7): 25.125,32.652 23.45,32.652 23.45,34.05 25.125,34.05
GND on Top Layer "GND_L01_P009" (solid, pour order 9): 8.525,29.3 9.725,29.3 9.725,31.125 8.524,31.125
GND on Top Layer "GND_L01_P008" (solid, pour order 8): 8.025,28.491 8.026,28.49 8.026,26.677 6.858,26.677 6.454,27.082 6.516,27.144 6.516,28.497
GND on GND "GND_L02_P021" (solid, pour order 21): 0.9,41.175 1.025,41.3 48.525,41.3 49.375,40.45 49.375,1.025 48.375,0.025 1.075,0.025 0.05,1.05 0.05,40.525
GND on Bottom Layer "GND_Bottom" (solid, pour order 23): 1.15,41.375 1.2,41.325 48.35,41.325 48.35,41.2 49.375,40.175 49.325,40.125 49.325,0.975 49.275,0.975 48.4,0.1 0.775,0.1 0.775,0.425 0.05,1.15 0.05,40.275

## Keep-outs
Keep-Out Layer:
  lines w0.254: 0,1.418 ccw(c1.346,1.35) 1.278,0.003 ; 0.001,40.078 0.004,1.418 ; 0.003,40.078 cw(c1.35,40.011) 1.418,41.357 48.125,41.357 ; 1.257,0 48.1,0 ; 47.936,-0.003 ccw(c48.004,1.343) 49.35,1.275 49.35,39.936 ; 48.075,41.35 cw(c48.007,40.004) 49.353,39.936

## Other copper
Top Layer:
  region net GND: 19.533,16.625 17.853,16.625 17.853,14.967 19.533,14.967
  region net 3V3: 12.384,22.671 11.376,22.671 11.376,21.025 12.384,21.025
  rectangle net GND: 41.915,34.509 43.016,36.444
  region net GND: 41.319,34.045 41.319,34.87 40.711,34.87 40.711,34.045
  region net GND: 41.31,31.015 41.31,31.878 40.71,31.878 40.71,31.015
  region net GND: 39.759,40.914 39.759,39.844 40.75,39.844 40.75,40.914
  region net GND: 36.716,34.854 36.716,33.752 38.535,33.752 38.535,34.854
  region net GND: 40.268,32.694 39.089,32.694 39.089,31.494 40.268,31.494
  rectangle net GND: 34.779,32.159 35.8,32.673
  rectangle net GND: 41.903,26.675 43.004,28.624
  region net GND: 38.8,22.929 38.8,21.525 40,21.525 40,22.929
  region net GND: 42.195,19.902 42.195,20.875 40.995,20.875 40.995,19.902
  region net GND: 35.778,21.702 35.778,22.622 35.173,22.622 35.173,21.702
  region net GND: 35.673,19.753 34.438,19.753 34.438,19.163 35.673,19.163
  region net GND: 34.875,21.705 34.875,22.625 34.27,22.625 34.27,21.705
  region net GND: 38.884,18.109 38.884,19.082 37.901,19.082 37.901,18.109
  region net GND: 37.35,18.125 37.35,18.825 36.31,18.825 36.31,18.125
  region net GND: 28.772,34.851 28.772,33.75 30.35,33.75 30.35,34.851
  region net GND: 32.591,32.932 32.591,31.9 33.127,31.9 33.127,32.932
  region net GND: 25.842,41.065 25.842,38.86 26.548,38.86 26.548,41.065
  region net GND: 26.1,36.196 26.1,38.1 25.65,38.1 25.65,36.196
  region net GND: 29.275,20.675 28.575,20.675 28.575,19.692 29.275,19.692
  region net GND: 29.283,19.297 28.583,19.297 28.583,18.314 29.283,18.314
  rectangle net GND: 28.18,29.925 29.15,30.65
  rectangle net GND: 27.449,16.706 28.409,17.603
  region net GND: 36.66,16.067 36.66,15.08 37.379,15.08 37.379,16.067
  region net GND: 34.162,15.2 32.942,15.2 32.942,14.525 34.162,14.525
  region net GND: 33.027,13.013 33.027,11.999 33.739,11.999 33.739,13.013
  region net GND: 32.621,9.501 31.933,8.813 32.61,8.136 33.298,8.824
  region net GND: 40.622,6.355 39.94,6.355 39.94,5.409 40.622,5.409
  rectangle net GND: 36.674,2.515 37.752,3.515
  rectangle net GND: 33.445,2.425 34.123,3.303
  rectangle net GND: 33.224,3.621 34.197,4.652
  region net GND: 29.7,16.319 28.681,16.319 28.681,15.119 29.7,15.119
  region net GND: 29.3,6.986 29.3,7.9 28.85,7.9 28.85,6.986
  region net GND: 26.875,14.225 26.875,13.253 27.496,13.253 27.496,14.225
  rectangle net GND: 26.011,5.93 26.925,6.538
  rectangle net GND: 27.541,4.09 28.455,4.703
  rectangle net GND: 27.541,5.009 28.455,5.627
  rectangle net GND: 26.016,5.014 26.93,5.63
  rectangle net GND: 26.016,4.088 26.93,4.703
  region net GND: 12.575,34.525 12.575,33.605 13.18,33.605 13.18,34.525
  region net GND: 21.618,22.975 20.645,22.975 20.645,22.27 21.618,22.27
  region net GND: 20.754,20.37 20.754,21.379 20.192,21.379 20.192,20.37
  rectangle net GND: 20.022,23.181 21.018,23.718
  region net GND: 12.903,23.626 11.878,23.626 11.878,23.151 12.903,23.151
  region net GND: 12.275,34.968 10.695,34.968 10.695,34.262 12.275,34.262
  region net GND: 6.15,41.081 6.15,38.875 6.856,38.875 6.856,41.081
  region net GND: 4.053,32.269 4.053,31.443 4.759,31.443 4.759,32.269
  region net GND: 2.844,34.213 0.849,34.213 0.849,33.506 2.844,33.506
  rectangle net GND: 8.643,25.747 9.668,26.322
  region net GND: 2.85,26.89 0.855,26.89 0.855,26.184 2.85,26.184
  region net GND: 23.111,17.128 23.111,18.189 22.231,18.189 22.231,17.128
  region net GND: 21.358,16.648 20.683,16.648 20.683,15.789 21.358,15.789
  region net GND: 20.755,19.135 20.755,20.121 20.195,20.121 20.195,19.135
  region net GND: 21.095,18.425 20.181,18.425 20.181,17.827 21.095,17.827
  region net GND: 21.108,17.573 20.193,17.573 20.193,16.976 21.108,16.976
  region net GND: 21.65,14.4 21.65,15.373 20.45,15.373 20.45,14.4
  region net GND: 18.256,14.664 17.261,14.664 17.261,14.045 18.256,14.045
  rectangle net GND: 23.603,12.37 24.666,12.939
  region net GND: 21.804,9.499 21.115,8.811 21.792,8.134 22.48,8.822
  region net GND: 20.779,13.013 20.779,11.994 21.372,11.994 21.372,13.013
  region net GND: 10.514,18.62 9.501,18.62 9.501,18.021 10.514,18.021
  region net GND: 10.491,19.521 9.483,19.521 9.483,18.964 10.491,18.964
  region net LNA_OUT: 31.022,2.45 31.022,5.385 30.664,5.385 30.664,2.45
  region net NetC45_2: 30.111,2.867 29.086,2.867 29.086,2.442 30.111,2.442
  region net NetC44_1: 25.336,2.892 24.311,2.892 24.311,2.442 25.336,2.442
  region net LNA_IN: 23.717,2.4 23.717,5.41 23.359,5.41 23.359,2.4
  region net 3V3: 4.05,28.549 4.05,27.954 5.45,27.954 5.45,28.549
  region net 3V3: 31.238,18.755 30.532,18.755 30.532,17.751 31.238,17.751
  region net 3V3: 35.782,23.015 35.782,23.936 35.176,23.936 35.176,23.015
  rectangle net 3V3: 20.612,32.211 21.417,32.667
  region net 3V3: 8.436,24.456 8.436,23.483 9.636,23.483 9.636,24.456
  rectangle net 3V3: 22.546,23.443 23.249,24.441
  rectangle net DA_EN: 36.506,3.849 38.23,4.465
  region net V_DPDT2: 31.946,12.969 31.946,11.956 32.423,11.956 32.423,12.969
  region net 5V: 39.853,2.525 39.853,3.498 39.15,3.498 39.15,2.525
  region net 5V: 34.434,20.806 34.434,20.106 37.931,20.106 37.931,20.806
  region net 5V: 23.033,15.813 23.033,16.505 22.583,16.505 22.583,15.813
  region net 5V: 10.099,17.632 8.986,17.632 8.986,17 10.099,17
  region net 5V: 34.162,14.168 32.931,14.168 32.931,13.572 34.162,13.572
  rectangle net NetD3_2: 34.837,30.557 35.877,31.757
  rectangle net NetD3_2: 35.791,29.95 36.749,31.15
  region net VDD_DPDT: 22.066,13.015 22.066,11.989 22.544,11.989 22.544,13.015
  region net NetC42_1: 47.65,10.784 35.96,10.784 35.96,10.492 47.65,10.492
  rectangle net VDD_DPDT: 28.186,13.577 29.211,14.292
  region net VDD_DPDT: 31.928,10.022 31.235,9.329 31.581,8.983 32.274,9.676
  region net NetC41_2: 20.704,10.732 17.966,10.732 17.966,10.446 20.704,10.446
  region net NetC40_1: 11.885,10.736 9.624,10.736 9.624,10.444 11.885,10.444
  region net NetC40_2: 8.55,10.809 4.9,10.809 4.9,10.517 8.55,10.517
  region net V_DPDT1: 23.273,9.244 22.574,9.942 22.228,9.597 22.927,8.898
  pour cut-out: 27.224,12.006 27.247,12.029 30.349,12.029 30.349,11.832 30.319,11.802 30.288,11.832 27.247,11.832
  pour cut-out: 27.175,13.125 27.175,12.925 27.2,12.9 27.201,12.901 30.364,12.901 30.364,13.086 30.35,13.1
  pour cut-out: 26.875,18.825 28.15,18.825 28.15,21.5 28.225,21.575 30.15,21.575 30.15,14.925 29.9,14.675 28,14.675 28,16.155 26.825,17.33 26.825,18.675
  pour cut-out: 10.773,14.374 11.576,14.374 11.65,14.3 11.65,12.675 10.775,12.675
  pour cut-out: 21.775,3.686 21.775,8.8 17.225,8.8 16.125,7.7 16.125,6.422 13.525,6.422 10.947,9 5.878,9 5.878,3.664
  pour cut-out: 34.325,8.75 34.4,8.675 34.4,7.025 31.95,7.025 31.675,7.3 31.675,8.8
  pour cut-out: 30.45,12.675 49.075,12.675 49.075,8.775 30.45,8.775
  pour cut-out: 21.6,18.95 21.675,18.875 22.925,18.875 22.925,17.1 22.9,17.075 22.8,17.175 21.475,17.175
  pour cut-out: 21.7,23.175 23.925,23.175 24.075,23.025 24.075,21.9 21.85,21.9 21.75,21.8
  pour cut-out: 18.425,23.45 21.75,23.45 21.875,23.325 21.875,13.85 17.55,13.85 17.525,13.825 17.5,13.85 17.5,18.95
  pour cut-out: 7.9,23 17.4,23 17.4,16.45 7.9,16.45
  pour cut-out: 31.45,4.4 31.475,4.425 31.875,4.425 31.875,1.85 31.825,1.8 31.5,1.8
  pour cut-out: 21.688,4.6 22.95,4.6 22.95,1.775 21.712,1.775
  pour cut-out: 26.475,8.168 26.5,8.193 28.425,8.193 28.425,4.368 28.45,4.343 28.401,4.294 26.336,4.294 26.336,7.995 26.245,8.085
  pour cut-out: 37.9,23.425 37.95,23.375 39.475,23.375 39.475,21.375 37.9,21.375
  pour cut-out: 0.85,12.675 12.2,12.675 12.2,9.1 12.55,8.75 0.85,8.75
  pour cut-out: 24.45,10.275 30,10.275 30.175,10.1 30.175,7.1 24.8,7.1 24.475,7.425
  region net NetC42_2: 32.256,10.472 31.211,10.472 31.211,10.673 32.256,10.766
  region net NetU12_3: 30.106,11.149 30.811,11.07 30.811,10.87 30.106,10.859
  region net NetU12_3: 24.325,10.86 23.62,10.9 23.62,11.101 24.325,11.15
  pour cut-out: 17.425,10.862 17.425,12.625 22.2,12.625 22.2,9.225 22.2,8.8 18.293,8.8
  region net NetC41_1: 21.559,10.875 23.225,10.695 23.225,10.495 21.559,10.3

## Silkscreen, mask and mechanical layers (free items; w line width, h text height)
Top Overlay:
  drawing of 37 lines, arcs and shapes, not listed
  text "IO" at 5.825,36.225 h1.2 r90
  text "USB" at 28.45,34.8 h1.2 r90
  text "DCIN" at 44.025,24.1 h1.2
  text "SWD" at 0.3,22.45 h1.2
  text "RFout" at 41.9,4.325 h1.52
  text "RFin" at 0.425,4.225 h1.52
  text "CRFICS_LYY_20261016" at 6.613,2.485 h1.5
  text "0.9-1.3GHz 6bits数控移相器" at 4.963,1.11 h1.5

## Dimensions
47.975,41.375 to 1.257,0 on Top Overlay
0.001,40.078 to 49.35,39.936 on Top Overlay